# Altium PCB V3_Board.PcbDoc (part 4 of 7)
Units mil, origin at the board's own origin, x right, y up, seen from the top; angles counter-clockwise.
Board outline 6915 x 4422 mil, 2 copper layers (Top Layer, Bottom Layer), stack 57 mil thick; 364 components, 243 nets, 1048 pads, 599 vias.
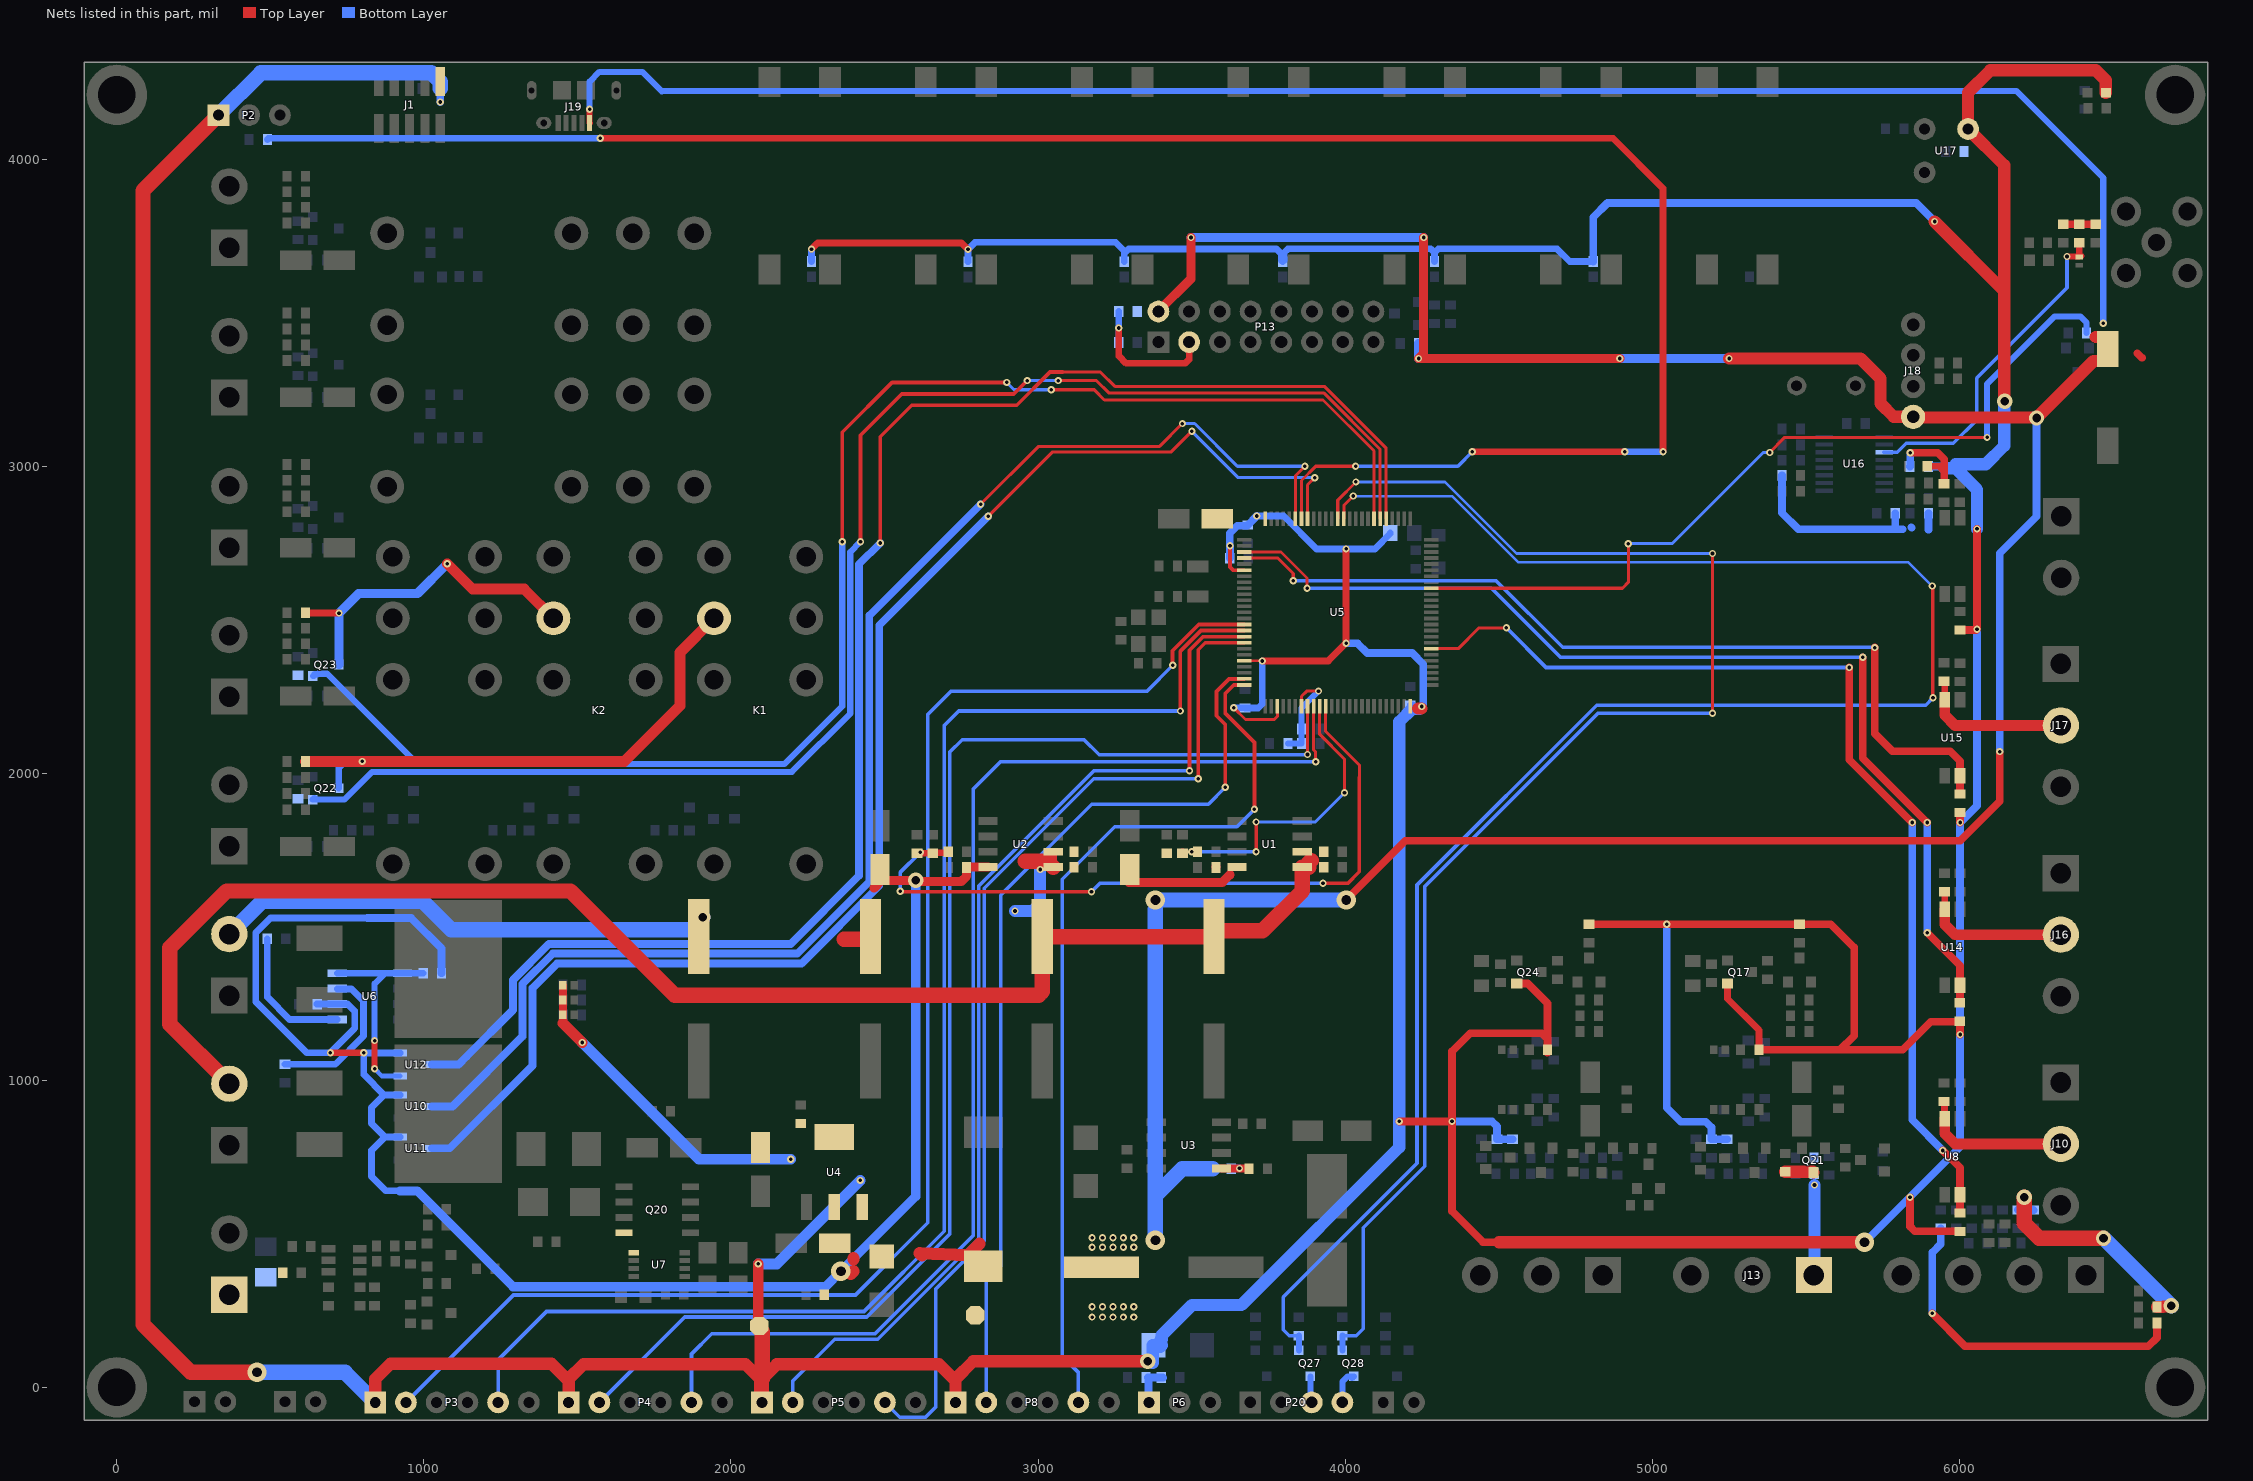
[diagram p2: the nets of this part, all layers, seen from the top]

## Part data (continued)
R38: library part RC0603FR-073K3L, "RES SMD 3.3K OHM 1% 1/10W 0603", Case/Package=0603, LCSC Part Number=C108078, Manufacturer="Yageo Phycomp", Max Operating Temperature=155°C, Min Operating Temperature=-55°C, Power Rating=100mW, Resistance=3.3kR, Supplier Part Number 1=311-3.30KHRCT-ND, Temperature Coefficient=100ppm/°C, Tolerance=1%, Voltage Rating (DC)=50V, Depth=0.8mm, Height=0.45mm, Lead Free="Lead Free", Length=1.6mm, Manufacturer Part Number=RC0603FR-073K3L, Mount="Surface Mount", Number of Pins=2, Packaging="Cut Tape", Pricing 1="1=0.1, 10=0.024, 100=0.0097, 1000=0.00437, 2500=0.00379 (USD)", REACH SVHC="No SVHC", Stock 1=6863000, Supplier 1=Digi-Key, Width=800um
R57: library part RC0603FR-070RL, "RES SMD 0R, 1%, 0.1W, 0603", Case Code (Imperial)=0603, Case Code (Metric)=1608, Current Rating=1A, Manufacturer=Yageo, Max Operating Temperature=155°C, Max Power Dissipation=100mW, Min Operating Temperature=-55°C, Package Quantity=5000, Resistance=0mR, Resistor Type="Thick Film", Temperature Coefficient=200ppm/°C, Tolerance=1%, Voltage Rating=50V, Working Voltage=75V, Case/Package=0603, Category="Chip SMD Resistors", ComponentLink1Description=https://datasheet.ciiva.com/11808/0900766b80f96399-11808172.pdf?src-supplier=RSComponents, ComponentLink1URL=https://datasheet.ciiva.com/11808/0900766b80f96399-11808172.pdf?src-supplier=RSComponents, ComponentLink2Description=https://datasheet.ciiva.com/5558/rc0603-272842-5558341.pdf?src-supplier=Mouser, ComponentLink2URL=https://datasheet.ciiva.com/5558/rc0603-272842-5558341.pdf?src-supplier=Mouser, ComponentLink3Description=https://datasheet.ciiva.com/46382/443971-46382072.pdf?src-supplier=Element14, ComponentLink3URL=https://datasheet.ciiva.com/46382/443971-46382072.pdf?src-supplier=Element14, ComponentLink4Description=https://datasheet.ciiva.com/29721/pyu-r-int-thick-7-29721178.pdf?src-supplier=Digi-Key, ComponentLink4URL=https://datasheet.ciiva.com/29721/pyu-r-int-thick-7-29721178.pdf?src-supplier=Digi-Key, ComponentLink5Description=https://datasheet.ciiva.com/5684/443971-5684699.pdf?src-supplier=Farnell, ComponentLink5URL=https://datasheet.ciiva.com/5684/443971-5684699.pdf?src-supplier=Farnell, ComponentLink6Description=https://datasheet.ciiva.com/7983/443971-7983627.pdf?src-supplier=Element14, ComponentLink6URL=https://datasheet.ciiva.com/7983/443971-7983627.pdf?src-supplier=Element14, ComponentLink7Description=https://datasheet.ciiva.com/29721/pyu-rc0603-51-rohs-l-4-29721179.pdf?src-supplier=Digi-Key, ComponentLink7URL=https://datasheet.ciiva.com/29721/pyu-rc0603-51-rohs-l-4-29721179.pdf?src-supplier=Digi-Key, ComponentLink8Description=https://datasheet.ciiva.com/22643/1868787-22643388.pdf?src-supplier=Element14, ComponentLink8URL=https://datasheet.ciiva.com/22643/1868787-22643388.pdf?src-supplier=Element14, Contact Plating=Tin,Matte, Depth=0.8mm, Features="Moisture Resistant", Height=0.45mm, Lead Free="Lead Free", Length=1.6mm, Manufacturer Part Number=RC0603FR-070RL, Military Standard=Not, Number of Pins=2, Number of Terminations=2, Packaging="Tape and Reel", Power Rating=100mW, Pricing 1="5000=0.00320, 5000=0.00490, 50000=0.00450, 500000=0.00250, 2500000=0.00150 (USD)", Radiation Hardening=No, REACH SVHC="No SVHC", RoHS=Yes, Stock 1=1270000, Supplier 1="Arrow Electronics", Supplier Part Number 1=RC0603FR-070RL, Termination=SMD/SMT, Voltage Rating (DC)=50V, Width=0.031inch
R63: library part RC0603JR-074K7L, "RES SMD 4.7K OHM 5% 1/10W 0603", Case Code (Imperial)=0603, Case Code (Metric)=1608, LCSC Part Number=C105428, Manufacturer=Yageo, Max Operating Temperature=155°C, Min Operating Temperature=-55°C, Power Rating=100mW, Resistance=4.7kR, Supplier Part Number 1=311-4.7KGRCT-ND, Temperature Coefficient=100ppm/°C, Tolerance=5%, Voltage Rating=50V, Case/Package=0603, ComponentLink1Description=http://www.farnell.com/datasheets/443971.pdf?src-supplier=Element14, ComponentLink1URL=http://www.farnell.com/datasheets/443971.pdf?src-supplier=Element14, Composition="Thick Film", Depth=0.8mm, Lead Free="Lead Free", Length=1.6mm, Manufacturer Part Number=RC0603JR-074K7L, Military Standard=Not, Number of Pins=2, Packaging="Tape and Reel", Pricing 1="1=0.1, 10=0.02, 100=0.0081, 1000=0.00362, 2500=0.00314 (USD)", REACH SVHC="No SVHC", Stock 1=19706643, Supplier 1=Digi-Key, Termination=SMD/SMT, Voltage Rating (DC)=50V, Width=0.8mm
R64: library part RC0805FR-07100KL, "RES 100K OHM 1% 1/8W 0805", Case Code (Imperial)=0805, Case Code (Metric)=2012, LCSC Part Number=C96346, Manufacturer=Yageo, Max Operating Temperature=155°C, Max Power Dissipation=125mW, Min Operating Temperature=-55°C, Package Quantity=1, Resistance=100kR, Resistance Tolerance=1%, Resistor Type="Thick Film", Temperature Coefficient=100ppm/°C, Voltage Rating=150V, Case/Package=0805, Category="Chip SMD Resistors", ComponentLink1Description=https://datasheet.ciiva.com/11808/0900766b8106beab-11808858.pdf?src-supplier=RSComponents, ComponentLink1URL=https://datasheet.ciiva.com/11808/0900766b8106beab-11808858.pdf?src-supplier=RSComponents, ComponentLink2Description=https://datasheet.ciiva.com/7941/1686128-7941677.pdf?src-supplier=Element14, ComponentLink2URL=https://datasheet.ciiva.com/7941/1686128-7941677.pdf?src-supplier=Element14, ComponentLink3Description=https://datasheet.ciiva.com/7660/38627-7660796.pdf?src-supplier=Element14, ComponentLink3URL=https://datasheet.ciiva.com/7660/38627-7660796.pdf?src-supplier=Element14, ComponentLink4Description=https://datasheet.ciiva.com/22747/444164-22747534.pdf?src-supplier=Element14, ComponentLink4URL=https://datasheet.ciiva.com/22747/444164-22747534.pdf?src-supplier=Element14, ComponentLink5Description=https://datasheet.ciiva.com/2457/pyu-r-int-thick-7-2457018.pdf?src-supplier=Digi-Key, ComponentLink5URL=https://datasheet.ciiva.com/2457/pyu-r-int-thick-7-2457018.pdf?src-supplier=Digi-Key, ComponentLink6Description=https://datasheet.ciiva.com/2457/pyu-r-int-thick-7-2457019.pdf?src-supplier=Digi-Key, ComponentLink6URL=https://datasheet.ciiva.com/2457/pyu-r-int-thick-7-2457019.pdf?src-supplier=Digi-Key, ComponentLink7Description=https://datasheet.ciiva.com/2457/pyu-r-int-thick-7-2457017.pdf?src-supplier=Digi-Key, ComponentLink7URL=https://datasheet.ciiva.com/2457/pyu-r-int-thick-7-2457017.pdf?src-supplier=Digi-Key, ComponentLink8Description=https://datasheet.ciiva.com/12667/rc0805-12667001.pdf?src-supplier=Mouser, ComponentLink8URL=https://datasheet.ciiva.com/12667/rc0805-12667001.pdf?src-supplier=Mouser, ComponentLink9Description=https://datasheet.ciiva.com/7941/1697719-7941676.pdf?src-supplier=Element14, ComponentLink9URL=https://datasheet.ciiva.com/7941/1697719-7941676.pdf?src-supplier=Element14, ComponentLink10Description=https://datasheet.ciiva.com/7941/1697719-7941678.pdf?src-supplier=Element14, ComponentLink10URL=https://datasheet.ciiva.com/7941/1697719-7941678.pdf?src-supplier=Element14, ComponentLink11Description=https://datasheet.ciiva.com/16747/rc0805-16747226.pdf?src-supplier=Future+Electronics, ComponentLink11URL=https://datasheet.ciiva.com/16747/rc0805-16747226.pdf?src-supplier=Future+Electronics, Construction=Rectangular, Depth=1.25mm, Features="Moisture Resistant", Height=0.024inch, Item Type=Resistor, Lead Free="Lead Free", Lead Pitch=0.4mm, Length=0.079inch, Manufacturer Part Number=RC0805FR-07100KL, Military Standard=Not, Number of Pins=2, Number of Terminations=2, Packaging="Tape and Reel", Power Rating=125mW, Pricing 1="5000=0.00227, 10000=0.00224, 20000=0.00217 (USD)", RoHS=Yes, RoHS Compliant=Yes, Series=RC, Size Code=0805, Stock 1=695000, Supplier 1=Avnet, Supplier Part Number 1=RC0805FR-07100KL, Technology="THICK FILM", Termination=SMD/SMT, Tolerance=1%, Voltage Rating (DC)=150V, Width=0.049inch
R65: library part RC1206FR-7W1KL, "RES 1K OHM 1% 1/2W 1206", LCSC Part Number=C859155, Manufacturer=Yageo, Supplier Part Number 1=13-RC1206FR-7W1KLCT-ND, Category="Chip SMD Resistors", ComponentLink1Description=LCSC, ComponentLink1URL=https://www.lcsc.com/product-detail/Chip-Resistor-Surface-Mount_YAGEO-RC1206FR-7W1KL_C859155.html, Item Type=Resistor, Manufacturer Part Number=RC1206FR-7W1KL, Pricing 1="1=0.19000, 10=0.15700, 100=0.06150, 1000=0.02572, 2500=0.02358 (USD)", RoHS=Yes, RoHS Compliant=Yes, Stock 1=6215, Supplier 1=Digi-Key
R74: library part AC0603JR-0710KL, "RES SMD 10K OHM 5% 1/10W 0603", Case Code (Imperial)=0603, Case Code (Metric)=1608, Manufacturer=Yageo, Max Operating Temperature=155°C, Max Power Dissipation=100mW, Min Operating Temperature=-55°C, Package Quantity=1, Resistance=10kR, Resistor Type="Thick Film", Supplier Part Number 1=1029044, Temperature Coefficient=100ppm/°C, Tolerance=5%, Voltage Rating=50V, Case/Package=0603, Category="Chip SMD Resistors", ComponentLink1Description=https://datasheet.ciiva.com/5562/pyu-ac-51-rohs-l-2-5562553.pdf?src-supplier=Mouser, ComponentLink1URL=https://datasheet.ciiva.com/5562/pyu-ac-51-rohs-l-2-5562553.pdf?src-supplier=Mouser, Construction=Rectangular, Depth=0.8mm, Features="Moisture Resistant,Automotive AEC-Q200,Anti-Sulfur", Height=0.022inch, Lead Free="Lead Free", Length=0.063inch, Manufacturer Part Number=AC0603JR-0710KL, Military Standard=Not, Number of Terminations=2, Packaging="Tape and Reel", Power Rating=100mW, Pricing 1="5000=0.00540 (USD)", RoHS=Yes, RoHS Compliant=Yes, Series=AC, Size Code=0603, Stock 1=1533000, Supplier 1="Future Electronics", Termination=SMD/SMT, Width=0.031inch
R81: library part RC0603FR-07470RL, "RES 470 OHM 1% 1/10W 0603", Case Code (Imperial)=0603, Case Code (Metric)=1608, LCSC Part Number=C114669, Manufacturer=Yageo, Max Operating Temperature=155°C, Max Power Dissipation=100mW, Min Operating Temperature=-55°C, Package Quantity=1, Resistance Tolerance=1%, Resistor Type="Thick Film", Supplier Part Number 1=311-470HRCT-ND, Temperature Coefficient=100ppm/°C, Voltage Rating=50V, Working Voltage=75V, Case/Package=0603, Category="Chip SMD Resistors", ComponentLink1Description=https://datasheet.ciiva.com/11808/0900766b80f96399-11808177.pdf?src-supplier=RSComponents, ComponentLink1URL=https://datasheet.ciiva.com/11808/0900766b80f96399-11808177.pdf?src-supplier=RSComponents, ComponentLink2Description=https://datasheet.ciiva.com/7746/1738695-7746359.pdf?src-supplier=Element14, ComponentLink2URL=https://datasheet.ciiva.com/7746/1738695-7746359.pdf?src-supplier=Element14, ComponentLink3Description=https://datasheet.ciiva.com/7746/1738695-7746360.pdf?src-supplier=Element14, ComponentLink3URL=https://datasheet.ciiva.com/7746/1738695-7746360.pdf?src-supplier=Element14, ComponentLink4Description=https://datasheet.ciiva.com/7660/1868787-7660793.pdf?src-supplier=Element14, ComponentLink4URL=https://datasheet.ciiva.com/7660/1868787-7660793.pdf?src-supplier=Element14, ComponentLink5Description=https://datasheet.ciiva.com/46440/1868787-46440907.pdf?src-supplier=Element14, ComponentLink5URL=https://datasheet.ciiva.com/46440/1868787-46440907.pdf?src-supplier=Element14, ComponentLink6Description=https://datasheet.ciiva.com/2454/pyu-r-int-thick-7-2454012.pdf?src-supplier=Digi-Key, ComponentLink6URL=https://datasheet.ciiva.com/2454/pyu-r-int-thick-7-2454012.pdf?src-supplier=Digi-Key, ComponentLink7Description=https://datasheet.ciiva.com/2454/pyu-r-int-thick-7-2454013.pdf?src-supplier=Digi-Key, ComponentLink7URL=https://datasheet.ciiva.com/2454/pyu-r-int-thick-7-2454013.pdf?src-supplier=Digi-Key, ComponentLink8Description=https://datasheet.ciiva.com/2454/pyu-r-int-thick-7-2454014.pdf?src-supplier=Digi-Key, ComponentLink8URL=https://datasheet.ciiva.com/2454/pyu-r-int-thick-7-2454014.pdf?src-supplier=Digi-Key, Construction=Rectangular, Depth=0.8mm, Features="Moisture Resistant", Height=0.022inch, Lead Free="Lead Free", Length=1.6mm, Manufacturer Part Number=RC0603FR-07470RL, Military Standard=Not, Number of Terminations=2, Packaging="Tape and Reel", Power Rating=100mW, Pricing 1="1=0.10000, 10=0.02400, 100=0.00970, 1000=0.00436, 2500=0.00378 (USD)", REACH SVHC="No SVHC", Resistance=470R, RoHS=Yes, RoHS Compliant=Yes, Series=RC, Stock 1=154083, Supplier 1=Digi-Key, Technology="THICK FILM", Termination=SMD/SMT, Tolerance=1%, Width=0.031inch
R83 R84: library part RC0603FR-07200KL, "RES SMD 200K OHM 1% 1/10W 0603", Case Code (Imperial)=0603, Case Code (Metric)=1608, Manufacturer=Yageo, Max Operating Temperature=155°C, Max Power Dissipation=100mW, Min Operating Temperature=-55°C, Package Quantity=1, Resistance=200kR, Resistance Tolerance=1%, Resistor Type="Thick Film", Temperature Coefficient=100ppm/°C, Voltage Rating=50V, Case/Package=0603, Category="Chip SMD Resistors", ComponentLink1Description=https://datasheet.ciiva.com/2453/pyu-r-int-thick-7-2453959.pdf?src-supplier=Digi-Key, ComponentLink1URL=https://datasheet.ciiva.com/2453/pyu-r-int-thick-7-2453959.pdf?src-supplier=Digi-Key, ComponentLink2Description=https://datasheet.ciiva.com/2453/pyu-r-int-thick-7-2453960.pdf?src-supplier=Digi-Key, ComponentLink2URL=https://datasheet.ciiva.com/2453/pyu-r-int-thick-7-2453960.pdf?src-supplier=Digi-Key, ComponentLink3Description=https://datasheet.ciiva.com/2453/pyu-r-int-thick-7-2453958.pdf?src-supplier=Digi-Key, ComponentLink3URL=https://datasheet.ciiva.com/2453/pyu-r-int-thick-7-2453958.pdf?src-supplier=Digi-Key, Construction=Rectangular, Depth=0.8mm, Features="Moisture Resistant", Height=0.022inch, Lead Free="Lead Free", Length=1.6mm, Manufacturer Part Number=RC0603FR-07200KL, Military Standard=Not, Number of Pins=2, Number of Terminations=2, Packaging="Tape and Reel", Power Rating=100mW, Pricing 1="5000=0.00170 (USD)", REACH SVHC="No SVHC", RoHS=Yes, RoHS Compliant=Yes, Series=RC, Size Code=0603, Stock 1=365000, Supplier 1="Arrow Electronics", Supplier Part Number 1=RC0603FR-07200KL, Termination=SMD/SMT, Tolerance=1%, Voltage Rating (DC)=50V, Width=0.031inch
R89 R90 R99 R100 R105: library part RC0603FR-07100KL, "RES 100K OHM 1% 1/10W 0603", Case Code (Imperial)=0603, Case Code (Metric)=1608, Manufacturer=Yageo, Max Operating Temperature=155°C, Max Power Dissipation=100mW, Min Operating Temperature=-55°C, Resistance=100kR, Resistance Tolerance=1%, Resistor Type="Thick Film", Supplier Part Number 1=311-100KHRCT-ND, Temperature Coefficient=100ppm/°C, Voltage Rating=50V, Working Voltage=75V, Case/Package=0603, Category="Chip SMD Resistors", Construction=Rectangular, Depth=0.8mm, Features="Moisture Resistant", Height=0.45mm, Lead Free="Lead Free", Length=1.6mm, Manufacturer Part Number=RC0603FR-07100KL, Military Standard=Not, Number of Pins=2, Number of Terminations=2, Packaging="Tape and Reel", Power Rating=100mW, Pricing 1="1=0.10000, 10=0.02400, 100=0.00970, 1000=0.00436, 2500=0.00378 (USD)", REACH SVHC="No SVHC", RoHS=Yes, RoHS Compliant=Yes, Series=RC, Stock 1=4230938, Supplier 1=Digi-Key, Technology="THICK FILM", Termination=SMD/SMT, Tolerance=1%, Voltage Rating (DC)=50V, Width=0.8mm
R91 R92: library part RC0603FR-071ML, "Res SMD 0603 1M Ohm 1% 1/10W ±100ppm/°C Molded SMD Paper T/R", Case Code (Imperial)=0603, Case Code (Metric)=1608, Manufacturer=Yageo, Max Operating Temperature=155°C, Min Operating Temperature=-55°C, Package Quantity=5000, Power Rating=100mW, Resistance=1MR, Resistor Type="Thick Film", Temperature Coefficient=100ppm/°C, Tolerance=1%, Voltage Rating=75V, Voltage Rating (DC)=50V, Application(s)="HIGH RELIABILITY", Case/Package=0603, Category="Chip SMD Resistors", ComponentLink1Description=https://datasheet.ciiva.com/11819/0900766b80f96399-11819295.pdf?src-supplier=RSComponents, ComponentLink1URL=https://datasheet.ciiva.com/11819/0900766b80f96399-11819295.pdf?src-supplier=RSComponents, ComponentLink2Description=https://datasheet.ciiva.com/7983/443971-7983614.pdf?src-supplier=Element14, ComponentLink2URL=https://datasheet.ciiva.com/7983/443971-7983614.pdf?src-supplier=Element14, ComponentLink3Description=https://datasheet.ciiva.com/12555/rc0603-272842-12555388.pdf?src-supplier=Mouser, ComponentLink3URL=https://datasheet.ciiva.com/12555/rc0603-272842-12555388.pdf?src-supplier=Mouser, Depth=0.8mm, Height=0.45mm, Lead Free="Lead Free", Length=1.6mm, Manufacturer Part Number=RC0603FR-071ML, Military Standard=Not, Number of Pins=2, Packaging="Cut Tape", Pricing 1="5000=0.00200, 25000=0.00190 (USD)", REACH SVHC="No SVHC", RoHS=Yes, RoHS Compliant=Yes, Series=RC, Stock 1=440000, Supplier 1="Arrow Electronics", Supplier Part Number 1=RC0603FR-071ML, Technology="THICK FILM", Termination=SMD/SMT, Type="General Purpose", Weight=0.000847oz, Width=0.8mm
R93 R94: library part RC0603JR-07330RL, "RES  SMD 330R 100 mW 0603", Case Code (Imperial)=0603, Case Code (Metric)=1608, LCSC Part Number=C105879, Manufacturer=Yageo, Max Operating Temperature=155°C, Max Power Dissipation=100mW, Min Operating Temperature=-55°C, Package Quantity=5000, Resistance Tolerance=5%, Resistor Type="Thick Film", Supplier Part Number 1=311-330GRCT-ND, Temperature Coefficient=100ppm/°C, Voltage Rating=50V, Case/Package=0603, Category="Chip SMD Resistors", Construction=Rectangular, Depth=0.8mm, Features="Moisture Resistant", Height=0.45mm, Lead Free="Lead Free", Length=1.6mm, Manufacturer Part Number=RC0603JR-07330RL, Military Standard=Not, Number of Pins=2, Number of Terminations=2, Packaging="Tape and Reel", Power Rating=100mW, Pricing 1="1=0.10000, 10=0.02000, 100=0.00800, 1000=0.00360, 2500=0.00312 (USD)", REACH SVHC="No SVHC", Resistance=330R, RoHS=Yes, RoHS Compliant=Yes, Series=RC, Size Code=0603, Stock 1=1074593, Supplier 1=Digi-Key, Termination=SMD/SMT, Tolerance=5%, Voltage Rating (DC)=50V, Width=0.8mm
R95 R96: library part ARG05DTC5002, "RES SMD 50K ±0.5% ±25ppm/℃ 0805", Manufacturer="Viking Tech", Operating Temperature Range=-55℃~+155℃, Overload Voltage (Max)=150V, Package=0805, Temperature Coefficient=±25ppm/℃, ComponentLink1Description=LCSC, ComponentLink1URL=https://lcsc.com/product-detail/Chip-span-style-background-color-ff0-Resistor-span-Surface-Mount_Viking-Tech-ARG05DTC5002_C2828840.html, Resistance=50K
R97 R98: library part RC0603FR-07150KL, "Res SMD 0603 150K Ohm 1% 0.1W(1/10W) ±100ppm/C Pad SMD T/R", Case Code (Imperial)=0603, Case Code (Metric)=1608, Manufacturer=Yageo, Max Operating Temperature=155°C, Max Power Dissipation=100mW, Min Operating Temperature=-55°C, Package Quantity=1, Resistance=150kR, Resistance Tolerance=1%, Resistor Type="Thick Film", Temperature Coefficient=100ppm/°C, Voltage Rating=50V, Case/Package=0603, Category="Chip SMD Resistors", Construction=Rectangular, Depth=0.8mm, Features="Moisture Resistant", Height=0.022inch, Lead Free="Lead Free", Length=0.063inch, Manufacturer Part Number=RC0603FR-07150KL, Military Standard=Not, Number of Pins=2, Number of Terminations=2, Packaging="Tape and Reel", Power Rating=100mW, Pricing 1="1=0.04270, 10=0.02380, 25=0.02180, 100=0.00710, 250=0.00700, 500=0.00620, 1000=0.00400, 3000=0.00390 (USD)", REACH SVHC="No SVHC", RoHS=Yes, RoHS Compliant=Yes, Series=RC, Size Code=0603, Stock 1=3850, Supplier 1="Arrow Electronics", Supplier Part Number 1=RC0603FR-07150KL, Termination=SMD/SMT, Tolerance=1%, Voltage Rating (DC)=50V, Width=0.031inch
R103: library part RC0603DR-07150RL, "RES 150 OHM 0.5% 1/10W 0603", Case/Package=0603, Manufacturer=Yageo, Max Operating Temperature=155°C, Max Power Dissipation=100mW, Min Operating Temperature=-55°C, Resistor Type="Thick Film", Supplier Part Number 1=603-RC0603DR-07150RL, Temperature Coefficient=100ppm/°C, Tolerance=0.5%, Category="Chip SMD Resistors", ComponentLink1Description=http://www.yageo.com.tw/exep/pages/download/literatures/PYu-R_INT-thick_7.pdf?src-supplier=Digi-Key, ComponentLink1URL=http://www.yageo.com.tw/exep/pages/download/literatures/PYu-R_INT-thick_7.pdf?src-supplier=Digi-Key, Features="Moisture Resistant", Height=0.022inch, Length=0.063inch, Manufacturer Part Number=RC0603DR-07150RL, Number of Terminations=2, Packaging="Tape and Reel", Pricing 1="1=0.13000, 10=0.07000, 50=0.07000, 100=0.02900, 1000=0.01300, 10000=0.00700 (USD)", Resistance=150R, RoHS=Yes, RoHS Compliant=Yes, Supplier 1=Mouser, Width=0.031inch
R111 R115: library part RC0603FR-072K2L, "RES 2.2K OHM 1% 1/10W 0603", Case Code (Imperial)=0603, Case Code (Metric)=1608, LCSC Part Number=C114662, Manufacturer=Yageo, Max Operating Temperature=155°C, Max Power Dissipation=100mW, Min Operating Temperature=-55°C, Package Quantity=1, Resistance=2.2kR, Resistance Tolerance=1%, Resistor Type="Thick Film", Temperature Coefficient=100ppm/°C, Voltage Rating=50V, Case/Package=0603, Category="Chip SMD Resistors", Construction=Rectangular, Depth=0.8mm, Features="Moisture Resistant", Height=0.022inch, Item Type=Resistor, Lead Free="Lead Free", Length=1.6mm, Manufacturer Part Number=RC0603FR-072K2L, Military Standard=Not, Number of Terminations=2, Packaging="Tape and Reel", Power Rating=100mW, Pricing 1="5000=0.00133, 10000=0.00131, 20000=0.00127 (USD)", RoHS=Yes, RoHS Compliant=Yes, Series=RC, Size Code=0603, Stock 1=733100, Supplier 1=Avnet, Supplier Part Number 1=RC0603FR-072K2L, Termination=SMD/SMT, Tolerance=1%, Width=0.031inch
R112: library part RT0603BRD077K5L, "RES SMD 7.5K OHM 0.1% 1/10W 0603", Case Code (Imperial)=0603, Case Code (Metric)=1608, Manufacturer=Yageo, Max Operating Temperature=125°C, Max Power Dissipation=100mW, Min Operating Temperature=-55°C, Package Quantity=5000, Resistance=7.5kR, Resistor Type="Thin Film", Supplier Part Number 1=YAG2311CT-ND, Temperature Coefficient=25ppm/°C, Tolerance=0.1%, Voltage Rating=75V, Voltage Rating (DC)=50V, Case/Package=0603, Category="Chip SMD Resistors", ComponentLink1Description=https://datasheet.ciiva.com/8891/pyu-rt-1-to-0-05-rohs-l-4-8891914.pdf?src-supplier=Avnet, ComponentLink1URL=https://datasheet.ciiva.com/8891/pyu-rt-1-to-0-05-rohs-l-4-8891914.pdf?src-supplier=Avnet, Contact Plating=Tin,Matte, Features="Moisture Resistant", Height=0.022inch, Lead Free="Lead Free", Length=0.063inch, Manufacturer Part Number=RT0603BRD077K5L, Number of Terminations=2, Packaging="Tape and Reel", Power Rating=100mW, Pricing 1="1=0.34000, 10=0.28800, 100=0.11260, 500=0.06812, 1000=0.04716, 2500=0.04322 (USD)", Radiation Hardening=No, RoHS=Yes, RoHS Compliant=Yes, Series=RT, Size Code=0603, Stock 1=34037, Supplier 1=Digi-Key, Termination=SMD/SMT, Weight=7.1E-05oz, Width=0.8mm
R113: library part RC0603DR-073K3L, "RES 3.3K OHM 0.5% 1/10W 0603", Case/Package=0603, Manufacturer=Yageo, Max Operating Temperature=155°C, Max Power Dissipation=100mW, Min Operating Temperature=-55°C, Resistance=3.3kR, Resistor Type="Thick Film", Supplier Part Number 1=603-RC0603DR-073K3L, Temperature Coefficient=100ppm/°C, Tolerance=0.5%, Category="Chip SMD Resistors", ComponentLink1Description=http://www.yageo.com.tw/exep/pages/download/literatures/PYu-R_INT-thick_7.pdf?src-supplier=Digi-Key, ComponentLink1URL=http://www.yageo.com.tw/exep/pages/download/literatures/PYu-R_INT-thick_7.pdf?src-supplier=Digi-Key, Features="Moisture Resistant", Height=0.022inch, Length=0.063inch, Manufacturer Part Number=RC0603DR-073K3L, Number of Terminations=2, Packaging="Tape and Reel", Pricing 1="1=0.13000, 10=0.07000, 50=0.07000, 100=0.02900, 1000=0.01300, 10000=0.00700 (USD)", RoHS=Yes, RoHS Compliant=Yes, Supplier 1=Mouser, Width=0.031inch
R116: library part RC0603FR-0720KL, "RES 20K OHM 1% 1/10W 0603", Case Code (Imperial)=0603, Case Code (Metric)=1608, LCSC Part Number=C105575, Manufacturer=Yageo, Max Operating Temperature=155°C, Max Power Dissipation=100mW, Min Operating Temperature=-55°C, Package Quantity=1, Resistance=20kR, Resistance Tolerance=1%, Resistor Type="Thick Film", Temperature Coefficient=100ppm/°C, Voltage Rating=50V, Case/Package=0603, Category="Chip SMD Resistors", ComponentLink1Description=https://datasheet.ciiva.com/11808/0900766b80f96399-11808275.pdf?src-supplier=RSComponents, ComponentLink1URL=https://datasheet.ciiva.com/11808/0900766b80f96399-11808275.pdf?src-supplier=RSComponents, ComponentLink2Description=https://datasheet.ciiva.com/22747/443971-22747525.pdf?src-supplier=Element14, ComponentLink2URL=https://datasheet.ciiva.com/22747/443971-22747525.pdf?src-supplier=Element14, ComponentLink3Description=https://datasheet.ciiva.com/2453/pyu-r-int-thick-7-2453911.pdf?src-supplier=Digi-Key, ComponentLink3URL=https://datasheet.ciiva.com/2453/pyu-r-int-thick-7-2453911.pdf?src-supplier=Digi-Key, ComponentLink4Description=https://datasheet.ciiva.com/2453/pyu-r-int-thick-7-2453912.pdf?src-supplier=Digi-Key, ComponentLink4URL=https://datasheet.ciiva.com/2453/pyu-r-int-thick-7-2453912.pdf?src-supplier=Digi-Key, ComponentLink5Description=https://datasheet.ciiva.com/2453/pyu-r-int-thick-7-2453910.pdf?src-supplier=Digi-Key, ComponentLink5URL=https://datasheet.ciiva.com/2453/pyu-r-int-thick-7-2453910.pdf?src-supplier=Digi-Key, Construction=Rectangular, Depth=0.8mm, Features="Moisture Resistant", Height=0.022inch, Lead Free="Lead Free", Length=0.063inch, Manufacturer Part Number=RC0603FR-0720KL, Military Standard=Not, Number of Pins=2, Number of Terminations=2, Packaging="Tape and Reel", Power Rating=100mW, Pricing 1="5000=0.00240, 10000=0.00220, 25000=0.00200, 50000=0.00190, 125000=0.00180 (USD)", REACH SVHC="No SVHC", RoHS=Yes, RoHS Compliant=Yes, Series=RC, Size Code=0603, Stock 1=945000, Supplier 1="Arrow Electronics", Supplier Part Number 1=RC0603FR-0720KL, Technology="THICK FILM", Termination=SMD/SMT, Tolerance=1%, Voltage Rating (DC)=50V, Width=0.031inch
R117 R118: library part RC0603JR-070RL, "RES 0 OHM JUMPER 1/10W 0603", Case Code (Imperial)=0603, Case Code (Metric)=1608, Manufacturer=Yageo, Max Operating Temperature=155°C, Max Power Dissipation=100mW, Min Operating Temperature=-55°C, Package Quantity=5000, Resistance=0mR, Resistance Tolerance=5%, Resistor Type="Thick Film", Supplier Part Number 1=311-0.0GRCT-ND, Temperature Coefficient=200ppm/°C, Tolerance=1%, Voltage Rating=50V, Case/Package=0603, Category="Chip SMD Resistors", Construction=Rectangular, Contact Plating=Tin,Matte, Depth=0.8mm, Features="Moisture Resistant", Height=0.45mm, Lead Free="Lead Free", Length=1.6mm, Manufacturer Part Number=RC0603JR-070RL, Military Standard=Not, Number of Pins=2, Number of Terminations=2, Packaging="Tape and Reel", Power Rating=100mW, Pricing 1="1=0.10000, 10=0.01700, 25=0.01240, 50=0.00960, 100=0.00700, 250=0.00536, 500=0.00430, 1000=0.00316 (USD)", Radiation Hardening=No, Reach SVHC Compliant="No SVHC", RoHS=Yes, RoHS Compliant=Yes, Series=RC, Size Code=0603, Stock 1=18081776, Supplier 1=Digi-Key, Technology="THICK FILM", Termination=SMD/SMT, Voltage Rating (DC)=50V, Width=0.8mm
SB1 SB2 SB3 SB4 SB5 SB6 SB7 SB8 SB9 SB10 SB11 SB12 SB13 SB14 SB15 SB16 SB17 SB18 SB19 SB20 SB21 SB22 SB23 SB24 SB25 SB26 SB27 SB28 SB29 SB30 SB31 SB32 SB33 SB34 SB35 SB36 SB37 SB38 SB39 SB40 SB41 SB42: "Solder Bridge ON"
SW1 SW2 SW3 SW4 SW5 SW6 SW7: library part TL3300CF160Q, "SWITCH TACTILE SPST-NO 0.05A 12V", Case/Package=SMD/SMT, Contact Resistance=100mR, Current Rating=50mA, Manufacturer=E-Switch, Max Operating Temperature=70°C, Max Voltage Rating (DC)=12V, Min Operating Temperature=-25°C, Operating Force=160gf, Package Quantity=1, Supplier Part Number 1=612-TL3300CF160Q, Actuator Length=5mm, Actuator Type=Standard, ComponentLink1Description=http://www.e-switch.com/system/asset/product_line/data_sheet/157/TL3300.pdf?src-supplier=Digi-Key, ComponentLink1URL=http://www.e-switch.com/system/asset/product_line/data_sheet/157/TL3300.pdf?src-supplier=Digi-Key, ComponentLink2Description=http://spec_sheets.e-switch.com/specs/N301102.pdf?src-supplier=Digi-Key, ComponentLink2URL=http://spec_sheets.e-switch.com/specs/N301102.pdf?src-supplier=Digi-Key, Contact Plating=Silver, Electrical Life=200000Cycles, Illumination Type=Non-Illuminated, Lead Free="Lead Free", Manufacturer Part Number=TL3300CF160Q, Mechanical Life=200000Cycles, Mount="Surface Mount", Orientation=Straight, Packaging="Tape and Reel", Pricing 1="1=0.53, 10=0.513, 50=0.43, 100=0.393, 1000=0.293, 10000=0.274 (USD)", RoHS Compliant=Yes, Series=TL3300, Stock 1=1884, Supplier 1=Mouser, Switch Function=Off-Mom, Switch Travel=0.35mm, Termination="Gull Wing", Throw Configuration=SPST, Voltage Rating (DC)=12V
U1 U2: "SENSOR CURRENT HALL 20A DC", Case/Package=SOIC, Current Sensing=20A, Frequency=80kHz, Manufacturer="Allegro MicroSystems", Max Operating Temperature=150°C, Max Supply Current=14mA, Min Operating Temperature=-40°C, Supplier Part Number 1=620-1645-1-ND, Accuracy=3%, Category="Current Sensors", ComponentLink1Description=http://www.farnell.com/datasheets/2838158.pdf?src-supplier=Farnell, ComponentLink1URL=http://www.farnell.com/datasheets/2838158.pdf?src-supplier=Farnell, ComponentLink2Description=http://www.farnell.com/datasheets/2838158.pdf?src-supplier=Newark, ComponentLink2URL=http://www.farnell.com/datasheets/2838158.pdf?src-supplier=Newark, ComponentLink3Description=http://www.allegromicro.com/~/media/Files/Datasheets/ACS723-Datasheet.ashx?src-supplier=Digi-Key, ComponentLink3URL=http://www.allegromicro.com/~/media/Files/Datasheets/ACS723-Datasheet.ashx?src-supplier=Digi-Key, ComponentLink4Description=https://www.allegromicro.com/~/media/Files/Datasheets/ACS723-Datasheet.ashx?src-supplier=Digi-Key, ComponentLink4URL=https://www.allegromicro.com/~/media/Files/Datasheets/ACS723-Datasheet.ashx?src-supplier=Digi-Key, Linearity=1%, Manufacturer Part Number=ACS723LLCTR-20AU-T, Mount="Surface Mount", Number of Channels=1, Number of Pins=8, Packaging="Tape and Reel", Polarity=Unidirectional, Pricing 1="1=4.46000, 5=3.94000, 10=3.47900, 25=2.82280, 50=2.49480, 100=2.42900, 500=2.03516, 1000=1.90385 (USD)", Response Time=5us, RoHS=Yes, RoHS Compliant=Yes, Sensitivity=200mV/A, Supplier 1=Digi-Key
U3: "1.5-A boost, buck, inverting switching regulator, operation from 0°C to 70°C 8-SOIC 0 to 70", Case/Package=D, Manufacturer="Texas Instruments", Max Input Voltage=40V, Max Operating Temperature=70°C, Max Output Current=750mA, Min Input Voltage=3V, Min Operating Temperature=0°C, Min Output Voltage=1.55V, Output Current=1.5A, Package Quantity=1, Quiescent Current=4mA, Supplier Part Number 1=296-17765-1-ND, Switching Frequency=100kHz, Category="Power Supply Modules", ComponentLink1Description=https://datasheet.ciiva.com/7408/1862376-7408060.pdf?src-supplier=Newark, ComponentLink1URL=https://datasheet.ciiva.com/7408/1862376-7408060.pdf?src-supplier=Newark, ComponentLink2Description=https://datasheet.ciiva.com/2025/mc33063a-2025162.pdf?src-supplier=Digi-Key, ComponentLink2URL=https://datasheet.ciiva.com/2025/mc33063a-2025162.pdf?src-supplier=Digi-Key, ComponentLink3Description=https://datasheet.ciiva.com/2025/mc33063a-2025161.pdf?src-supplier=Digi-Key, ComponentLink3URL=https://datasheet.ciiva.com/2025/mc33063a-2025161.pdf?src-supplier=Digi-Key, ComponentLink4Description=https://datasheet.ciiva.com/2025/mc33063a-2025163.pdf?src-supplier=Digi-Key, ComponentLink4URL=https://datasheet.ciiva.com/2025/mc33063a-2025163.pdf?src-supplier=Digi-Key, Contact Plating=Gold, Lead Free="Lead Free", Manufacturer Part Number=MC34063ADR, Max Output Voltage=40V, Number of Outputs=1, Number of Pins=8, Output Type=Adjustable, Output Voltage=40V, Packaging="Tape and Reel", Pricing 1="1=0.78000, 10=0.68400, 25=0.64240, 100=0.52420, 250=0.48688, 500=0.41438, 1000=0.34206 (USD)", Radiation Hardening=No, REACH SVHC="No SVHC", RoHS=Yes, RoHS Compliant=Yes, Stock 1=17204, Supplier 1=Digi-Key, Synchronous Rectifier=No, Termination=SMD/SMT, Topology=Flyback,SEPIC, Weight=0.002561oz
U4: "IC REG LINEAR 3.3V 1A SOT223", Case/Package=SOT-223, Current Rating=1A, Dropout Voltage=1.2V, Manufacturer="Texas Instruments", Max Input Voltage=15V, Max Operating Temperature=125°C, Min Input Voltage=2.5V, Min Operating Temperature=0°C, Nominal Output Voltage=3.3V, Nominal Supply Current=5mA, Output Voltage Accuracy=1%, Package Quantity=1000, Quiescent Current=10mA, Accuracy=1%, Category="Voltage Regulators - Linear", ComponentLink1Description=https://datasheet.ciiva.com/3225/lms8117a-3225472.pdf?src-supplier=Avnet, ComponentLink1URL=https://datasheet.ciiva.com/3225/lms8117a-3225472.pdf?src-supplier=Avnet, ComponentLink2Description=https://datasheet.ciiva.com/2066/lms8117a-2066594.pdf?src-supplier=Digi-Key, ComponentLink2URL=https://datasheet.ciiva.com/2066/lms8117a-2066594.pdf?src-supplier=Digi-Key, ComponentLink3Description=https://datasheet.ciiva.com/2066/lms8117a-2066595.pdf?src-supplier=Digi-Key, ComponentLink3URL=https://datasheet.ciiva.com/2066/lms8117a-2066595.pdf?src-supplier=Digi-Key, ComponentLink4Description=https://datasheet.ciiva.com/2066/lms8117a-2066596.pdf?src-supplier=Digi-Key, ComponentLink4URL=https://datasheet.ciiva.com/2066/lms8117a-2066596.pdf?src-supplier=Digi-Key, ComponentLink5Description=https://datasheet.ciiva.com/3223/lms8117a-3223813.pdf?src-supplier=Avnet, ComponentLink5URL=https://datasheet.ciiva.com/3223/lms8117a-3223813.pdf?src-supplier=Avnet, ComponentLink6Description=https://datasheet.ciiva.com/25979/lms8117a-25979141.pdf?src-supplier=Avnet+Europe, ComponentLink6URL=https://datasheet.ciiva.com/25979/lms8117a-25979141.pdf?src-supplier=Avnet+Europe, ComponentLink7Description=https://datasheet.ciiva.com/46386/1558097-46386039.pdf?src-supplier=Element14, ComponentLink7URL=https://datasheet.ciiva.com/46386/1558097-46386039.pdf?src-supplier=Element14, ComponentLink8Description=https://datasheet.ciiva.com/8042/90386-8042363.pdf?src-supplier=Element14, ComponentLink8URL=https://datasheet.ciiva.com/8042/90386-8042363.pdf?src-supplier=Element14, ComponentLink9Description=https://datasheet.ciiva.com/5697/1558097-5697692.pdf?src-supplier=Farnell, ComponentLink9URL=https://datasheet.ciiva.com/5697/1558097-5697692.pdf?src-supplier=Farnell, Contact Plating=Tin,Matte, Height=1.6mm, Lead Free="Lead Free", Length=6.5mm, Manufacturer Part Number=LMS8117AMP-3.3/NOPB, Max Output Current=1A, Mount="Surface Mount", Number of Outputs=1, Number of Pins=4, Output Current=1A, Output Type=Fixed, Output Voltage=3.3V, Packaging="Tape and Reel", Polarity=Positive, Pricing 1="1=1.18760, 10=1.01800, 100=0.77540, 250=0.68460, 500=0.64870, 1000=0.59270 (USD)", Radiation Hardening=No, REACH SVHC="No SVHC", RoHS=Yes, RoHS Compliant=Yes, Stock 1=843, Supplier 1="Arrow Electronics", Supplier Part Number 1=LMS8117AMP-3.3/NOPB, Width=3.56mm
U5: "IC MCU 32BIT 128KB FLASH 100LQFP", Case/Package=LQFP, Frequency=48MHz, Manufacturer=STMicroelectronics, Max Operating Temperature=85°C, Max Power Dissipation=476mW, Max Supply Voltage=3.6V, Min Operating Temperature=-40°C, Min Supply Voltage=2V, Package Quantity=540, Supplier Part Number 1=16AC3535, Category=Microcontrollers, ComponentLink1Description=https://datasheet.ciiva.com/29987/dm00090510-29987095.pdf?src-supplier=Avnet, ComponentLink1URL=https://datasheet.ciiva.com/29987/dm00090510-29987095.pdf?src-supplier=Avnet, Core Architecture=ARM, Data Bus Width=32b, Interface=I2C,SPI,USB,CAN,HDMI,IrDA,UART,USART,LIN,I2S, Lead Free="Lead Free", Manufacturer Part Number=STM32F072VBT6, Max Frequency=48MHz, Memory Size=128KB, Memory Type=FLASH, Mount="Surface Mount", Number of ADC Channels=19, Number of I/Os=87, Number of Pins=100, Number of Programmable I/O=87, Number of Timers/Counters=9, Oscillator Type=Internal, Packaging=Tray, Peripherals=POR,PWM,WDT,DMA, Pricing 1="1=8.45000, 10=7.60000, 25=7.18000, 50=6.70000, 100=6.23000 (USD)", Radiation Hardening=No, RAM Size=16KB, RoHS=Yes, RoHS Compliant=Yes, Supplier 1=Newark, Watchdog Timer=Yes
U6: "IC GATE DRVR LOW-SIDE 8SOIC", Case/Package=SOIC, Manufacturer="ON Semiconductor", Max Operating Temperature=140°C, Max Output Current=5A, Max Supply Current=3mA, Max Supply Voltage=20V, Min Operating Temperature=-40°C, Min Supply Voltage=4.5V, Supplier Part Number 1=NCP81071ADR2GOSDKR-ND, Category="Gate Drivers", Channel Type=Independent, ComponentLink1Description=https://datasheet.ciiva.com/48511/ncp81071-d-48511319.pdf?src-supplier=Avnet, ComponentLink1URL=https://datasheet.ciiva.com/48511/ncp81071-d-48511319.pdf?src-supplier=Avnet, Height=1.5mm, Lead Free="Lead Free", Length=5mm, Manufacturer Part Number=NCP81071ADR2G, Mount="Surface Mount", Number of Drivers=2, Number of Outputs=2, Number of Pins=8, Packaging="Cut Tape", Pricing 1="1=1.40000, 10=1.25100, 25=1.18720, 100=0.97520, 250=0.91160, 500=0.80560, 1000=0.70000 (USD)", REACH SVHC="No SVHC", RoHS=Yes, RoHS Compliant=Yes, Supplier 1=Digi-Key, Width=4mm
U7: "IC OR CTRLR N+1 8MSOP", Case/Package=MSOP, Manufacturer="Analog Devices / Linear Technology", Max Operating Temperature=70°C, Max Output Current=180mA, Max Supply Voltage=80V, Min Operating Temperature=0°C, Min Supply Voltage=4V, Operating Supply Current=150uA, Package Quantity=50, Supplier Part Number 1=584-LTC4359CMS8#PBF, Category="Power Management ICs", ComponentLink1Description=https://datasheet.ciiva.com/6609/4359fb-6609306.pdf?src-supplier=Digi-Key, ComponentLink1URL=https://datasheet.ciiva.com/6609/4359fb-6609306.pdf?src-supplier=Digi-Key, Lead Free="Lead Free", Manufacturer Part Number=LTC4359CMS8#PBF, Number of Drivers=1, Number of Pins=8, Packaging=Rail/Tube, Pricing 1="1=4.95000, 10=4.44000, 50=4.19000, 100=3.63000, 1000=3.09000, 10000=3.09000 (USD)", RoHS=Yes, Stock 1=57, Supplier 1=Mouser, Turn-Off Delay Time=300ns, Turn-On Delay Time=200us
U8 U9 U14 U15: "TransistorOptocouplers DC 1 2500Vrms SOP-4_P1.27 Optocouplers RoHS", Case/Package=SOIC, Collector Emitter Saturation Voltage=300mV, Forward Voltage=1.2V, Manufacturer=CEL, Max Collector Current=30mA, Max Operating Temperature=100°C, Max Output Voltage=80V, Max Power Dissipation=120mW, Min Operating Temperature=-55°C, Package Quantity=1, Supplier Part Number 1=PS2801C-1-F3-ACT-ND, Collector Emitter Voltage (VCEO)=300mV, ComponentLink1Description=http://www.cel.com/pdf/datasheets/PS2801C-1,PS2801C-4.pdf?src-supplier=Digi-Key, ComponentLink1URL=http://www.cel.com/pdf/datasheets/PS2801C-1,PS2801C-4.pdf?src-supplier=Digi-Key, ComponentLink2Description=http://www.cel.com/pdf/datasheets/how_to_order_optos.pdf?src-supplier=Digi-Key, ComponentLink2URL=http://www.cel.com/pdf/datasheets/how_to_order_optos.pdf?src-supplier=Digi-Key, ComponentLink3Description=http://datasheet.iiic.cc/cel/PS2801C-1-F3-A.pdf?src-supplier=IIIC, ComponentLink3URL=http://datasheet.iiic.cc/cel/PS2801C-1-F3-A.pdf?src-supplier=IIIC, Lead Free="Lead Free", Manufacturer Part Number=PS2801C-1-F3-A, Mount="Surface Mount", Number of Channels=1, Number of Pins=4, Output Current per Channel=30mA, Packaging="Tape and Reel", Pricing 1="1=0.77, 10=0.595, 100=0.3825 (USD)", Stock 1=399, Supplier 1=Digi-Key
U10 U11 U12: "IC BUF NON-INVERT 5.5V SOT23-5", Case/Package=SOT-23-5, High Level Output Current=-8mA, Low Level Output Current=8mA, Manufacturer="Texas Instruments", Max Operating Temperature=125°C, Max Supply Voltage=5.5V, Min Operating Temperature=-40°C, Min Supply Voltage=1.6V, Package Quantity=3000, Quiescent Current=1uA, Supplier Part Number 1=296-37176-6-ND, ComponentLink1Description=http://www.ti.com/lit/pdf/sdyu001?src-supplier=Digi-Key, ComponentLink1URL=http://www.ti.com/lit/pdf/sdyu001?src-supplier=Digi-Key, ComponentLink2Description=http://www.ti.com/lit/ds/symlink/sn74lv1t34.pdf?src-supplier=Avnet, ComponentLink2URL=http://www.ti.com/lit/ds/symlink/sn74lv1t34.pdf?src-supplier=Avnet, Lead Free="Lead Free", Logic Function=Buffer,Inverting, Manufacturer Part Number=SN74LV1T34DBVR, Mount="Surface Mount", Number of Bits=1, Number of Bits per Element=1, Number of Channels=1, Number of Elements=1, Number of Input Lines=1, Number of Inputs=1, Number of Output Lines=1, Number of Outputs=1, Number of Pins=5, Operating Supply Current=8mA, Packaging="Tape and Reel", Polarity=Non-Inverting, Pricing 1="1=0.43, 10=0.349, 25=0.3192, 100=0.2374, 250=0.2152, 500=0.17808, 1000=0.13356 (USD)", Propagation Delay=15.5ns, Radiation Hardening=No, REACH SVHC="No SVHC", RoHS Compliant=Yes, Stock 1=37360, Supplier 1=Digi-Key, Weight=0.000353oz
U13: "SOT-23-6 Comparators ROHS", Case/Package=SOT, Manufacturer="Texas Instruments", Max Operating Temperature=125°C, Max Supply Voltage=18V, Min Operating Temperature=-40°C, Min Supply Voltage=1.8V, Nominal Supply Current=7uA, Number of Voltages Monitored=2, Operating Supply Current=5.5uA, Package Quantity=3000, Quiescent Current=11uA, Supplier Part Number 1=595-TPS3700DDCR, Undervoltage Threshold=1.7V, Category=Comparators, ComponentLink1Description=https://datasheet.ciiva.com/15106/getdatasheetpartid-496993-15106246.pdf?src-supplier=Verical, ComponentLink1URL=https://datasheet.ciiva.com/15106/getdatasheetpartid-496993-15106246.pdf?src-supplier=Verical, ComponentLink2Description=https://datasheet.ciiva.com/22693/1882693-22693543.pdf?src-supplier=Element14, ComponentLink2URL=https://datasheet.ciiva.com/22693/1882693-22693543.pdf?src-supplier=Element14, ComponentLink3Description=https://datasheet.ciiva.com/6625/tps3700-6625126.pdf?src-supplier=Digi-Key, ComponentLink3URL=https://datasheet.ciiva.com/6625/tps3700-6625126.pdf?src-supplier=Digi-Key, ComponentLink4Description=https://datasheet.ciiva.com/6625/tps3700-6625125.pdf?src-supplier=Digi-Key, ComponentLink4URL=https://datasheet.ciiva.com/6625/tps3700-6625125.pdf?src-supplier=Digi-Key, ComponentLink5Description=https://datasheet.ciiva.com/6625/tps3700-6625129.pdf?src-supplier=Digi-Key, ComponentLink5URL=https://datasheet.ciiva.com/6625/tps3700-6625129.pdf?src-supplier=Digi-Key, ComponentLink6Description=https://datasheet.ciiva.com/14204/tps3700-14204199.pdf?src-supplier=Avnet, ComponentLink6URL=https://datasheet.ciiva.com/14204/tps3700-14204199.pdf?src-supplier=Avnet, Hysteresis=5.5mV, Lead Free="Lead Free", Manufacturer Part Number=TPS3700DDCR, Mount="Surface Mount", Number of Channels=1, Number of Elements=2, Number of Pins=6, Packaging="Tape and Reel", Pricing 1="1=2.75000, 10=2.48000, 25=2.34000, 50=2.34000, 100=2.00000, 250=1.87000, 500=1.64000, 1000=1.36000, 3000=1.35000, 10000=1.35000 (USD)", Propagation Delay=29us, Radiation Hardening=No, REACH SVHC="No SVHC", RoHS=Yes, RoHS Compliant=Yes, Series=TPS3700, Supplier 1=Mouser, Supply Current=7uA, Watchdog Timer=No
U16: "RF RX ASK/OOK 300-450MHZ 16QSOP", Case/Package=QSOP, Current - Receiving=6mA, Frequency=450MHz, Manufacturer=Microchip, Max Operating Temperature=105°C, Max Supply Voltage=3.6V, Min Frequency=300MHz, Min Operating Temperature=-40°C, Min Supply Voltage=3V, Nominal Supply Current=4.3mA, Operating Frequency="300 MHz to 450 MHz", Package Quantity=98, Bandwidth=330kHz, Category="Interface ICs", ComponentLink1Description=https://datasheet.ciiva.com/2798/micrf220-2798468.pdf?src-supplier=Digi-Key, ComponentLink1URL=https://datasheet.ciiva.com/2798/micrf220-2798468.pdf?src-supplier=Digi-Key, ComponentLink2Description=https://datasheet.ciiva.com/30475/0900766b81133813-30475820.pdf?src-supplier=RSComponents, ComponentLink2URL=https://datasheet.ciiva.com/30475/0900766b81133813-30475820.pdf?src-supplier=RSComponents, ComponentLink3Description=https://datasheet.ciiva.com/1164/micrf220-1164232.pdf?src-supplier=Element14, ComponentLink3URL=https://datasheet.ciiva.com/1164/micrf220-1164232.pdf?src-supplier=Element14, Data Rate=20Kbps, Depth=3.91mm, Height=1.47mm, Lead Free="Lead Free", Length=4.9mm, Manufacturer Part Number=MICRF220AYQS, Max Frequency=450MHz, Mount="Surface Mount", Number of Pins=16, Packaging=Rail/Tube, Pricing 1="1=2.15000 (USD)", Radiation Hardening=No, REACH SVHC="No SVHC", RoHS=Yes, RoHS Compliant=Yes, Sensitivity=-112.5dBm, Series=QwikRadio®, Stock 1=5131, Supplier 1="Arrow Electronics", Supplier Part Number 1=MICRF220AYQS, Supply Current=4.3mA, Width=3.91mm
U17: "Through Hole Biometric Sensors ROHS", Manufacturer=Senba, ComponentLink1Description=LCSC, ComponentLink1URL=https://www.lcsc.com/product-detail/Biometric-Sensors_Senba-Sensing-Tech-AS312_C90465.html, Manufacturer Part Number=AS312
X1: library part XC32M4-8.000-F18LJDT, "8MHz SMD Crystal Resonator 18pF 200Ω ±20ppm ±30ppm -40℃~+85℃ SMD3225-4P Crystals ROHS", Manufacturer=HCI, ComponentLink1Description=LCSC, ComponentLink1URL=https://www.lcsc.com/product-detail/Crystals_HCI-XC32M4-8-000-F18LJDT_C2905353.html, Manufacturer Part Number=XC32M4-8.000-F18LJDT
X2: library part S1C13523ZWFAC, "13.52313MHz In-line passive crystal oscillator 20pF 60Ω ±20ppm ±30ppm -40℃~+85℃ HC-49S-2P Crystals ROHS", LCSC Part Number=C2681243, Manufacturer=JYJE, Package=HC-49S-2P, ComponentLink1Description=LCSC, ComponentLink1URL=https://www.lcsc.com/product-detail/Crystals_JYJE-S1C13523ZWFAC_C2681243.html, Manufacturer Part Number=S1C13523ZWFAC
X3: library part X321532768KGD2SI, "32.768kHz SMD Crystal Resonator 12.5pF ±20ppm -40℃~+85℃ SMD3215-2P Crystals ROHS", Manufacturer="Yangxing Tech", ComponentLink1Description=LCSC, ComponentLink1URL=https://www.lcsc.com/product-detail/Crystals_Yangxing-Tech-X321532768KGD2SI_C620155.html, Manufacturer Part Number=X321532768KGD2SI

## Free pads (board coordinates)
  round 196.85 hole 122.05: MH1(1.14,4208.89) MH1(1.18,1.18) MH1(6701.82,1.18) MH1(6701.82,4208.82)

## Via types
v1: diameter 23.62, hole 11.81, Top Layer to Bottom Layer, 557 vias
v2: diameter 62.99, hole 31.5, Top Layer to Bottom Layer, 31 vias
v3: diameter 50, hole 28, Top Layer to Bottom Layer, 11 vias

## Nets (pads, with @x,y where several pads share a name; then routed paths per layer and width w, separated by ;. In a path a pad name is that pad's centre, name@x,y a point inside that pad or via, vN(x,y) a via of type N, cw(c..) or ccw(c..) an arc to the next point about the centre after c; other vN are vias at no path point)
0-10V: R112.1 SB36.1 | length 1124.5
  Top Layer w25: v1(5911,242) 6018,135 6615,135 6643,163 SB36.1@6643,211
  Bottom Layer w25: v1(5911,242) 5911,440 5939,468 R112.1@5939,519
3V3: C23.1 C26.1 C27.1 C28.1 C29.1 C30.1 C31.1 C48.1 C49.1 C51.1 C52.1 C75.2 C76.1 D3.2 J1.1 L1.1 LED1.1 LED2.1 LED3.1 LED8.1 P1.1 P2.1 P3.1 P4.1 P5.1 P6.1 P8.1 Q17.2 Q24.2 R18.2 R19.2 R20.2 R21.2 R22.2 R23.2 R31.2 R35.2 R43.2 R45.2 R48.2 R49.2 R54.2 R55.2 R66.2 R76.2 R79.2 R93.2 R94.2 R104.2 U4.2 U4.4 U5.6 U5.21 U5.28 U5.50 U5.100 U17.1 | length 31948.9
  Top Layer w8: U5.21@3670.75,2366.68 3729.32,2366.68 v1(3730,2366)
  Top Layer w10: v1(3637,2214) 3675.5,2175.5 3769.5,2175.5 3779.02,2185.02 U5.28@3779.02,2219.04
  Top Layer w12: v1(3625,2741) 3625,2672 3635.05,2661.95 U5.6@3670.75,2661.95
  Top Layer w22: v1(2262.65,3707) 2282.65,3727 2751,3727 v1(2772,3706) ; v1(3730,2366) 3946,2366 ; 3946,2367 v1(4003,2424) v1(4003,2731) ; Q17.2@5244.63,1316.05 5244.63,1266.37 5347,1164 R94.2@5347,1100
  Top Layer w25: 1453.25,1187.75 LED1.1@1453.25,1214.56 LED2.1@1453.25,1262.63 LED3.1@1453.25,1310.69 ; P1.1@2089,204 P1.1@2092,201 ; v1@4177,867 v1(4348,867) ; 4501,474 4449,474 4348,575 v1(4348,867) ; Q24.2@4558.63,1316.05 4593.95,1316.05 4659,1251 4659,1135 ; R93.2@4659,1091 R93.2@4659,1100 4659,1135 ; R49.2@4803,1509 v1(5047,1509) R48.2@5479,1509 5581,1509 5657,1433 5657,1146 5611,1100 ; R94.2@5347,1100 5611,1100 ; v1(5839,620) 5839,525 5855,509 R76.2@6002,509 ; R35.2@6001,1193 R35.2@6002,1192 ; v1(6002,1150) R35.2@6002,1192 ; v1(6002,1840) R23.2@6002,1873 ; R79.2@6002,2467 6055,2467 v1(6057,2469) v1(6057,2796) ; v1(4348,867) 4348,1095 4407.55,1154.55 4639.45,1154.55 4659,1135 ; 5611,1100 5815,1100 5907,1192 R35.2@6002,1192
  Top Layer w35: 1453.25,1187.75 1453.25,1186.75 v1(1516,1124) ; P1.1@2089,204 v1(2089,403)
  Top Layer w40: P3.1@842.14,-47.83 842.14,28.17 891.97,78 1416.31,78 1470.14,24.17 ; P4.1@1471.89,-47.83 1471.89,28.17 1519.89,76.17 2047.89,76.17 2099.89,24.17 ; P5.1@2101.64,-47.83 2101.64,28.17 2149.64,76.17 2677.64,76.17 2729.64,24.17 ; P8.1@2731.39,-47.83 2731.39,28.17 2789.22,86 v3(3357,86) ; 4237.5,2211.58 v1@4247.58,2211.58 ; 4501,474 v2(5691,474) ; v1(5919,3797) 6146,3570 ; v3@6146,3212 6146,3570 ; LED8.1@6476.53,4216 6476.53,4256.47 6444,4289 6100,4289 6028,4217 U17.1@6028,4098 6146,3980 6146,3570
  Top Layer w50: P2.1@331.83,4143.14 86,3897.31 86,206 242,50 v2(457,50) ; P1.1@2092,201 2096.64,196.36 2096.64,186.71 2101.64,181.71 2101.64,28.17 ; P5.1@2099.89,-46.08 2099.89,24.17
  Bottom Layer w22: R18.2@2262.79,3667.05 v1@2262.79,3706.85 ; R19.2@2772.3,3665.9 2772.15,3666.05 2772.15,3705.85 v1(2772,3706) 2795,3729 3253,3729 3280.41,3701.59 3280.41,3692.41 ; R21.2@3280.41,3665.9 3280.41,3692.41 ; v1(3637,2214) C29.1@3677.5,2214 ; C29.1@3674,2213 3717.11,2213 3730,2225.89 v1(3730,2366) ; v1(3712,2838) 3800,2838 3907,2731 v1(4003,2731) 4096.96,2731 4146.77,2780.81 L1.1@4146.77,2783.17 ; C27.1@4212.23,2223.01 C27.1@4214.73,2223.01 ; C27.1@4216.45,2220.73 4218.73,2223.01 C27.1@4221.2,2223.01 ; C27.1@4218.73,2216.51 C27.1@4218.73,2219.01 ; R22.2@4290.59,3666.9 4290.59,3695.59 4290.92,3695.92 ; R22.2@4291.53,3670.1 4291.53,3695.31 4290.92,3695.92 ; R66.2@4807.74,3669.15 4805.5,3666.9 4731.1,3666.9 4690,3708 4303,3708 4290.92,3695.92 ; 3280.41,3692.41 3295,3707 3776.78,3707 3792.53,3691.26 3792.53,3669.9 R20.2@3796.53,3665.9 3800.53,3669.9 3800.53,3695.11 3813.41,3708 4278.84,3708 4290.92,3695.92